# Altium PCB zulu_a7_fab_b.PcbDoc (part 4 of 5)
Units mm, origin at the board's own origin, x right, y up, seen from the top; angles counter-clockwise.
Board outline 69.85 x 25.4 mm, 6 copper layers (Top Layer, L2-GND, L3-SIG, L4-SIG, L5-VCC3V3, Bottom Layer), stack 1.65 mm thick; 178 components, 177 nets, 839 pads, 1782 vias.
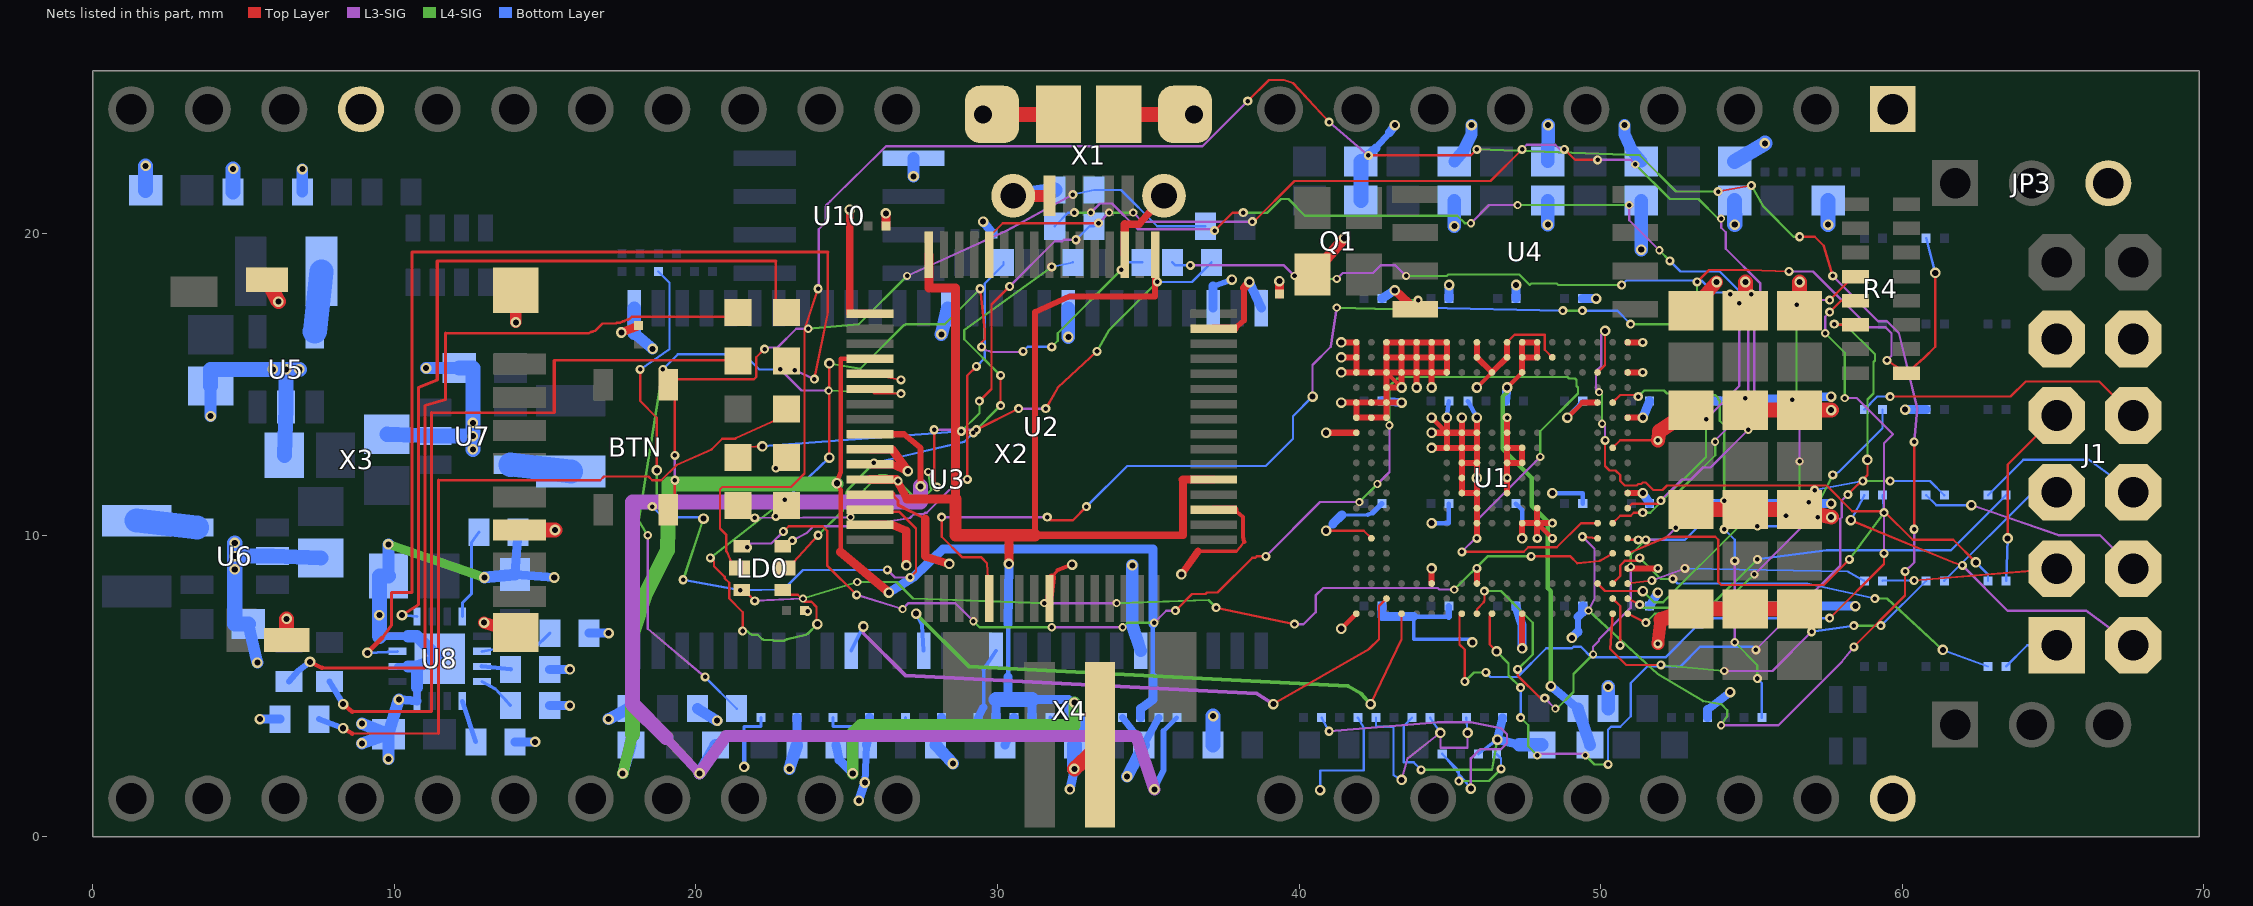
[diagram p7: the nets of this part, all layers, seen from the top]

## Via types
v1: diameter 0.35, hole 0.2, Top Layer to Bottom Layer, tented both sides, 387 vias
v2: diameter 0.27, hole 0.15, L3-SIG to L4-SIG, tented both sides, 368 vias
v3: diameter 0.3, hole 0.15, Top Layer to L2-GND, tented both sides, 299 vias
v4: diameter 0.3, hole 0.15, L2-GND to L3-SIG, tented both sides, 284 vias
v5: diameter 0.3, hole 0.15, L4-SIG to L5-VCC3V3, tented both sides, 223 vias
v6: diameter 0.3, hole 0.15, L5-VCC3V3 to Bottom Layer, tented both sides, 221 vias

## Nets (pads, with @x,y where several pads share a name; then routed paths per layer and width w, separated by ;. In a path a pad name is that pad's centre, name@x,y a point inside that pad or via, vN(x,y) a via of type N, cw(c..) or ccw(c..) an arc to the next point about the centre after c; other vN are vias at no path point) (continued)
FPGA-TDI: R4.14 U1.W10 | length 29.7
  Top Layer w0.076: U1.W10@46.4,7.4 46.325,7.325 46.325,6.375 v1(46.55,6.15) ; v3(57.75,17) 57.772,16.978 R4.14@58.45,16.978 ; v3(58.2,11.35) 58.85,12 v1(58.85,12.5)
  L3-SIG w0.076: v2(47.9,2.7) 47.95,2.75 49.45,2.75 v2(49.5,2.7) ; v2(55.15,6.2) 57.95,9 57.95,10.55 58,10.6 58,11.15 v3(58.2,11.35)
  L4-SIG w0.076: v1(46.55,6.15) 46.95,5.75 46.95,5.35 v5(47.35,4.95) ; v5(47.35,3.95) 47.6,3.7 47.6,3 v2(47.9,2.7) ; v2(49.5,2.7) 49.8,2.4 v5(50.25,2.4) ; v3(57.75,17) 58.1,17 59.1,16 59.1,15.8 59.05,15.75 59.05,14.7 58.85,14.5 v1(58.85,12.5)
  Bottom Layer w0.076: v5(47.35,3.95) v5(47.35,4.95) ; v5(50.25,2.4) 50.25,3.55 50.35,3.65 50.65,3.65 51,4 51,5.1 51.55,5.65 52.65,5.65 53.3,6.3 55.05,6.3 v2(55.15,6.2)
  other v2: 57.75,17
  other v4: 58.2,11.35 57.75,17
  other v5: 55.15,6.2
  other v6: 50.25,2.4 47.35,3.95 47.35,4.95 55.15,6.2
FPGA-TDO: R4.13 U1.W8 | length 29
  Top Layer w0.076: U1.W8@45.4,7.4 45.325,7.325 45.325,6.375 45.5,6.2 v3(45.5,5.15) ; v3(57.6,7.25) 59.4,9.05 v3(59.4,9.4) ; v3(57.6,17.4) 57.978,17.778 R4.13@58.45,17.778
  L3-SIG w0.076: v2(57.45,16.7) 57.45,17.25 v3(57.6,17.4) ; v2(58.1,14.55) 58.5,14.55 59.7,13.35 59.4,13.05 v3(59.4,9.4)
  L4-SIG w0.076: v3(45.5,5.15) 45.8,5.45 v5(46.2,5.45) ; v2(57.45,16.7) 58.1,16.05 v2(58.1,14.55)
  Bottom Layer w0.076: v5(46.2,5.45) 46.35,5.3 47.25,5.3 48.2,6.25 49.05,6.25 49.1,6.3 49.35,6.3 49.7,5.95 52.15,5.95 53.15,6.95 53.4,6.95 53.7,7.25 v3(57.6,7.25)
  other v2: 45.5,5.15 57.6,7.25
  other v4: 45.5,5.15 57.6,7.25 59.4,9.4 57.6,17.4
  other v5: 57.6,7.25
  other v6: 46.2,5.45 57.6,7.25
FPGA-TMS: R4.12 U1.W9 | length 28.1
  Top Layer w0.076: U1.W9@45.9,7.4 45.9,7.55 46.125,7.775 46.125,7.8 46.15,7.825 v3(46.15,8.15) ; v3(47.25,5.55) 47.25,5.35 48,4.6 v3(48.15,4.6) ; v3(57.6,17.8) 58.378,18.578 R4.12@58.45,18.578
  L3-SIG w0.076: v3(48.15,4.6) v2(48.5,4.25) ; v2(49.75,6.05) 49.75,6.3 49.95,6.5 49.95,6.55 51,7.6 v2(51,8.95) ; v2(56.35,14.5) 56.6,14.25 v2(56.6,12.45) ; v2(56.5,17.65) 56.65,17.8 v3(57.6,17.8)
  L4-SIG w0.076: v3(46.15,8.15) 46.7,8.15 47.75,7.1 47.75,6.05 v3(47.25,5.55) ; v2(48.5,4.25) 48.55,4.25 49.1,4.8 49.1,5.4 v2(49.75,6.05) ; v2(51,8.95) 51,9.35 v5(51.5,9.85) ; v5(56.15,10.65) 56.6,11.1 v2(56.6,12.45) ; v2(56.35,14.5) 56.35,14.55 56.5,14.7 v2(56.5,17.65)
  Bottom Layer w0.076: v5(51.5,9.85) 52.8,9.85 53.6,10.65 v5(56.15,10.65)
  other v2: 47.25,5.55 46.15,8.15
  other v4: 48.15,4.6 47.25,5.55 46.15,8.15 57.6,17.8
  other v6: 51.5,9.85 56.15,10.65
FT-PWREN#: U1.P19 U2.60 | length 41.1
  Top Layer w0.076: U2.60@29.725,19.3 29.725,19.9 30.175,20.35 v3(33.35,20.35) ; v3(38.45,20.4) 38.5,20.4 39.85,21.75 46.35,21.75 v3(47.4,22.8) ; v3(48.8,22.8) 49.15,22.45 v3(49.9,22.45) ; U1.P19@50.9,9.9 50.95,9.85 v3(51.25,9.85)
  L3-SIG w0.076: v3(33.35,20.35) v2(33.7,20.7) ; v2(34.5,20.7) 34.8,20.4 v3(38.45,20.4) ; v3(47.4,22.8) 47.55,22.95 48.5,22.95 48.65,22.8 v3(48.8,22.8) ; v3(49.9,22.45) 51,22.45 v2(51.15,22.3) ; v3(51.25,9.85) 52.1,9.85 v2(52.5,10.25) ; v2(53.8,13.1) 53.8,13.15 55.1,14.45 55.1,17.7 55.3,17.9 55.3,18.35 54.15,19.5 54.15,20.05 54,20.2 v2(54,20.5)
  L4-SIG w0.076: v2(33.7,20.7) v2(34.5,20.7) ; v2(51.15,22.3) 52.3,21.15 53.25,21.15 53.9,20.5 v2(54,20.5) ; v2(52.5,10.25) 52.5,11.35 53.8,12.65 v2(53.8,13.1)
  other v4: 51.25,9.85 33.35,20.35 38.45,20.4 49.9,22.45 47.4,22.8 48.8,22.8
FT-REF: R18.2 U2.6 | length 22.4
  Top Layer w0.076: U2.6@25.775,14.85 25.925,14.7 v3(26.8,14.7)
  L3-SIG w0.076: v2(18.4,10) 18.4,6.9 v2(20.3,5.3) ; v2(22.8,15.5) 23.5,14.8 v2(24.4,14.8)
  L4-SIG w0.076: v2(18.4,10) 18.1,10.5 v5(18.9,15.5) ; v2(24.4,14.8) v3(26.8,14.7)
  Bottom Layer w0.076: v5(18.9,15.5) 19.4,16 21.6,16 22.1,15.5 v2(22.8,15.5) ; v2(20.3,5.3) R18.2@21.35,4.25
  other v2: 26.8,14.7
  other v4: 26.8,14.7
  other v5: 20.3,5.3 22.8,15.5
  other v6: 20.3,5.3 18.9,15.5 22.8,15.5
FT-RESETN: R19.1 U2.14 | length 24.3
  Top Layer w0.076: v3(18.15,15.5) 18.15,14.45 18.7,13.9 v1(18.7,12.15) ; v1@20.15,10.6 20.15,10.55 v1(20.25,10.55) ; U2.14@25.775,10.85 25.85,10.775 26.75,10.775 27.3,10.225 27.3,8.8 v3(27.1,8.6)
  L3-SIG w0.076: v2(26.35,8.85) 26.6,8.6 v3(27.1,8.6)
  L4-SIG w0.076: v5(18.55,10.95) 18.7,11.1 v1(18.7,12.15) ; v5(19.575,8.525) v1(20.25,10.55)
  Bottom Layer w0.076: v3(18.15,15.5) 19.125,16.175 19.125,18.375 R19.1@18.75,18.75 ; v5(18.55,10.95) 18.9,10.6 20.15,10.6 v1(20.25,10.55) ; v5(19.575,8.525) v6(21.475,8.175) 22.9,8.2 23.55,8.85 v2(26.35,8.85)
  other v2: 18.15,15.5
  other v4: 27.1,8.6 18.15,15.5
  other v5: 26.35,8.85 18.15,15.5
  other v6: 19.575,8.525 26.35,8.85 18.55,10.95 18.15,15.5
FT-VCORE: C139.2 C152.2 C153.2 C154.2 U2.12 U2.37 U2.49 U2.64 | length 57.3
  Top Layer w0.2: 31.237,10 31.237,17.4 32.4,17.92 35.225,17.92 U2.49@35.225,19.3
  Top Layer w0.26: 31.237,10 36.15,10 36.15,11.85
  Top Layer w0.275: 26.65,11.85 27,11.2
  Top Layer w0.28: 36.15,11.85 U2.37@37.175,11.85
  Top Layer w0.3: U2.12@25.775,11.85 26.65,11.85 ; 27,11.2 28.6,11.2 28.6,18.2 27.725,18.2 U2.64@27.725,19.3 ; v1(30.375,9.05) 30.375,10
  Top Layer w0.4: 28.6,11.2 28.6,10 30.375,10 31.237,10
  L4-SIG w0.39: v1(25.2,2.1) 25.2,3.45
  L4-SIG w0.4: 25.2,3.45 25.45,3.7 32.55,3.7 v1(32.55,4.45)
  Bottom Layer w0.15: 30.35,5.3 30.35,7.05
  Bottom Layer w0.29: 24.75,2.55 v1(25.2,2.1)
  Bottom Layer w0.3: C139.2@24.65,3.05 24.75,2.55 ; C152.2@29.949,3.95 29.949,4.55 ; 30.35,4.55 30.35,5.3 ; 30.35,7.05 v1(30.375,9.05) ; C153.2@31.149,3.95 31.149,4.55 32.349,4.55 ; C154.2@32.349,3.95 32.349,4.55 ; v1(32.55,4.45) 32.349,4.55
  Bottom Layer w0.5: 29.949,4.55 30.35,4.55 31.149,4.55
FT-VPHY: C40.2 L4.1 U2.4 | length 41.1
  Top Layer w0.15: v1@24.65,11.725 v1(24.675,11.725) ; 24.8,9.45 24.8,11.3 24.8,11.5 24.775,11.55 24.65,11.675 24.65,11.7 24.8,12.1 24.8,15.85 U2.4@25.775,15.85
  Top Layer w0.3: 24.8,9.45 v1(26.4,8.1)
  L4-SIG w0.15: v1@24.65,11.7 v1(24.675,11.725)
  L4-SIG w0.37: v1(17.57,2.1) 17.9,3.4
  L4-SIG w0.5: 17.9,3.4 17.9,6.8 18.3,8 19.05,9.5 19.1,11.7 v1@24.65,11.7
  Bottom Layer w0.15: 35.15,5.3 35.15,7.05
  Bottom Layer w0.3: v1(26.4,8.1) 27.2,8.6 28.2,9.55 35.15,9.55 35.15,7.05 ; C40.2@34.749,3.95 34.749,4.25 35.15,4.55 35.15,5.3
  Bottom Layer w0.37: v1(17.57,2.1) L4.1@17.85,3.05
FT-VPLL: C41.2 L5.1 U2.9 | length 43.8
  Top Layer w0.2: U2.9@25.775,13.35 26.9,13.35 27.45,12.9 v1(27.45,11.625)
  L3-SIG w0.3: 19,3.3 v1(20.12,2.1)
  L3-SIG w0.39: v1(20.12,2.1) 21,3.35
  L3-SIG w0.4: 21,3.35 34.6,3.35 v1(35.2,1.575)
  L3-SIG w0.5: 19,3.3 17.9,4.4 17.9,7.4 17.9,11.1 27.45,11.1 v1(27.45,11.625)
  Bottom Layer w0.15: 35.5,3.5 C41.2@35.949,3.95
  Bottom Layer w0.2: v1(35.2,1.575) 35.5,2.2 35.5,3.5
  Bottom Layer w0.39: v1(20.12,2.1) L5.1@20.65,3.05
GND: C3.1 C4.1 C5.1 C6.1 C7.1 C8.1 C9.1 C11.1 C12.1 C13.1 C38.1 C40.1 C41.1 C78.1 C80.1 C82.1 C84.1 C85.2 C86.2 C87.2 C88.2 C89.2 C90.2 C91.2 C92.2 C93.2 C94.2 C95.2 C96.2 C97.2 C98.2 C99.2 C100.2 C101.2 C102.2 C103.2 C104.2 C105.2 C106.2 C107.2 C108.2 C109.2 C110.2 C111.2 C112.2 C113.2 C114.2 C115.2 C116.2 C117.2 C118.2 C119.2 C120.2 C121.2 C122.2 C133.1 C134.1 C135.1 C136.1 C137.1 C138.1 C139.1 C140.2 C141.2 C142.2 C143.2 C144.2 C145.2 C146.2 C147.1 C148.1 C149.1 C150.1 C151.1 C152.1 C153.1 C154.1 C155.1 C156.1 C157.1 C158.1 C159.1 J1.5 J1.11 JP3.3 L6.1 LD1.K LD2.K Q1.2 R5.1 R11.1 R13.2 R15.1 R17.2 R18.1 R21.1 R22.1 R78.1 R86.1 R102.1 R103.1 R104.1 R105.1 R106.1 U1.A1 U1.A3 U1.A4 U1.A5 U1.A6 U1.A7 U1.A9 U1.A11 U1.A19 U1.B1 U1.B3 U1.B4 U1.B5 U1.B6 U1.B7 U1.B9 U1.B11 U1.B14 U1.C1 U1.C2 U1.C3 U1.C4 U1.C5 U1.C6 U1.C7 U1.C10 U1.C19 U1.D3 U1.E1 U1.E2 U1.E3 U1.E17 U1.F1 U1.F2 U1.F3 U1.F19 U1.G1 U1.G7 U1.G8 U1.G9 U1.G11 U1.H7 U1.H8 U1.H9 U1.H11 U1.H12 U1.H18 U1.J8 U1.J9 U1.J11 U1.J12 U1.K8 U1.L8 U1.L9 U1.L11 U1.L19 U1.M9 U1.M13 U1.N9 U1.N12 U1.N13 U1.P2 U1.T19 U1.U6 U1.U9 U1.V18 U1.W1 U1.W12 U2.1 U2.5 U2.10 U2.11 U2.13 U2.15 U2.25 U2.35 U2.47 U2.51 U3.6 U3.12 U3.28 U3.41 U3.46 U3.52 U3.54 U4.4 U5.2 U6.2 U7.2 U8.4 U8.6 U8.8 U8.17 U10.5 X1.5 X1.MH1 X1.MH2 X1.MP1 X1.MP2 X1.MP3 X1.MP4 X1.MS1 X1.MS2 X2.1 X2.17 X2.21 X3.6 X3.G1 X3.G2 X3.G3 X3.G4 X4.2 | length 267.2
  Top Layer w0.076: U2.5@25.775,15.35 v3(26.8,15.15) ; 37.93,9.47 38.056,9.622 38.18,9.78 ; v1(40.9,10.15) 42.15,10.15 U1.P2@42.4,9.9 ; U1.A11@46.9,16.4 47.15,16.65 48.15,16.65 48.15,16.15 U1.B14@48.4,15.9 ; U1.V18@50.4,7.9 50.65,7.65 v3(50.65,6.35) ; U1.H18@50.4,12.9 50.65,13.15 v3(51.9,13.15)
  Top Layer w0.1: U2.13@26.5,11.35 26.7,11.15 26.7,11 27.6,10.55
  Top Layer w0.105: 36.65,9.47 37.93,9.47
  Top Layer w0.11: U2.25@31.8,8.6 32,8.85
  Top Layer w0.13: U2.35@37.85,10.85 38.14,10.6 38.14,9.95
  Top Layer w0.14: 38.14,9.95 38.18,9.78
  Top Layer w0.145: 32,8.85 v1(32.475,9.025)
  Top Layer w0.15: v1(41.4,6.9) U1.W1@41.9,7.4 ; U1.C3@42.9,15.4 v1(43.4,14.9) ; v1(44.4,13.9) U1.G7@44.9,13.4 ; v1(45.9,14.9) U1.C10@46.4,15.4 ; U1.N13@47.9,10.4 v3(48.4,9.9) ; v1(48.9,13.9) 49.4,14.4
  Top Layer w0.18: U2.47@37.85,16.85 38.175,17.125
  Top Layer w0.2: v1(40.9,13.4) U1.G1@41.9,13.4 ; v1(41.4,14.4) U1.E1@41.9,14.4 ; v1(41.4,15.4) U1.C1@41.9,15.4 ; v1(41.4,15.9) U1.B1@41.9,15.9 ; v1(41.4,16.4) U1.A1@41.9,16.4 U1.B1@41.9,15.9 ; v1(43.4,14.4) U1.E3@42.9,14.4 ; v1(43.9,14.9) U1.C5@43.9,15.4 ; U1.U6@44.4,8.4 v1(44.4,8.9) ; v1(44.4,12.9) U1.H7@44.9,12.9 ; v1(44.4,13.4) U1.G7@44.9,13.4 ; v1(44.4,14.9) U1.C6@44.4,15.4 ; v1(44.9,13.9) U1.G7@44.9,13.4 ; v1(45.4,13.9) U1.G8@45.4,13.4 ; U1.U9@45.9,8.4 v3(45.9,8.9) ; v3(45.9,9.9) U1.N9@45.9,10.4 U1.M9@45.9,10.9 U1.L9@45.9,11.4 ; v1(45.9,13.9) U1.G9@45.9,13.4 ; U1.A9@45.9,16.4 U1.B9@45.9,15.9 U1.C10@46.4,15.4 U1.B11@46.9,15.9 U1.A11@46.9,16.4 ; U1.L11@46.9,11.4 v3(46.9,11.9) U1.J11@46.9,12.4 ; v3(46.9,13.9) U1.G11@46.9,13.4 U1.H11@46.9,12.9 ; v1(47.4,6.25) U1.W12@47.4,7.4 ; v1(47.4,9.9) U1.N12@47.4,10.4 U1.N13@47.9,10.4 ; v3(47.9,9.9) U1.N13@47.9,10.4 ; U1.M13@47.9,10.9 U1.N13@47.9,10.4 ; v3(48.4,10.4) U1.N13@47.9,10.4 ; 49.4,14.4 U1.E17@49.9,14.4 ; U1.T19@50.9,8.9 v3(51.9,8.9) ; U1.L19@50.9,11.4 v1(51.4,11.4) ; U1.F19@50.9,13.9 v1(51.4,13.9) ; U1.C19@50.9,15.4 v3(51.4,15.4) ; U1.A19@50.9,16.4 v3(51.4,16.4) ; U1.E1@41.9,14.4 U1.F1@41.9,13.9 U1.F2@42.4,13.9 U1.F3@42.9,13.9 ; U1.E1@41.9,14.4 U1.E2@42.4,14.4 U1.E3@42.9,14.4 ; U1.C1@41.9,15.4 U1.C2@42.4,15.4 U1.C3@42.9,15.4 ; U1.C1@41.9,15.4 U1.B1@41.9,15.9 ; U1.F3@42.9,13.9 U1.E3@42.9,14.4 ; U1.F3@42.9,13.9 U1.E3@42.9,14.4 ; U1.E3@42.9,14.4 U1.D3@42.9,14.9 ; U1.D3@42.9,14.9 U1.C3@42.9,15.4 ; U1.D3@42.9,14.9 v1(43.4,14.9) U1.C4@43.4,15.4 ; U1.C3@42.9,15.4 U1.B3@42.9,15.9 ; U1.C3@42.9,15.4 U1.C4@43.4,15.4 ; U1.B3@42.9,15.9 U1.B4@43.4,15.9 ; U1.B3@42.9,15.9 U1.A3@42.9,16.4 U1.A4@43.4,16.4 ; U1.C4@43.4,15.4 U1.B4@43.4,15.9 ; U1.C4@43.4,15.4 U1.C5@43.9,15.4 ; U1.B4@43.4,15.9 U1.B5@43.9,15.9 ; U1.B4@43.4,15.9 U1.A4@43.4,16.4 ; U1.A4@43.4,16.4 U1.A5@43.9,16.4 ; U1.C5@43.9,15.4 U1.B5@43.9,15.9 ; U1.C5@43.9,15.4 U1.C6@44.4,15.4 ; U1.B5@43.9,15.9 U1.B6@44.4,15.9 ; U1.B5@43.9,15.9 U1.A5@43.9,16.4 ; U1.A5@43.9,16.4 U1.A6@44.4,16.4 ; U1.C6@44.4,15.4 U1.B6@44.4,15.9 ; U1.C6@44.4,15.4 U1.C7@44.9,15.4 ; U1.C6@44.4,15.4 U1.C7@44.9,15.4 ; U1.B6@44.4,15.9 U1.B7@44.9,15.9 ; U1.B6@44.4,15.9 U1.A6@44.4,16.4 ; U1.A6@44.4,16.4 U1.A7@44.9,16.4 U1.B7@44.9,15.9 ; U1.H7@44.9,12.9 U1.H8@45.4,12.9 ; U1.H7@44.9,12.9 U1.G7@44.9,13.4 ; U1.G7@44.9,13.4 U1.G8@45.4,13.4 ; U1.C7@44.9,15.4 U1.B7@44.9,15.9 ; U1.J8@45.4,12.4 U1.K8@45.4,11.9 U1.L8@45.4,11.4 U1.L9@45.9,11.4 ; U1.J8@45.4,12.4 U1.J9@45.9,12.4 ; U1.J8@45.4,12.4 U1.H8@45.4,12.9 ; U1.H8@45.4,12.9 U1.H9@45.9,12.9 ; U1.H8@45.4,12.9 U1.G8@45.4,13.4 ; U1.G8@45.4,13.4 U1.G9@45.9,13.4 ; U1.L9@45.9,11.4 v1(45.9,11.9) U1.J9@45.9,12.4 ; U1.J9@45.9,12.4 U1.H9@45.9,12.9 ; U1.H9@45.9,12.9 U1.G9@45.9,13.4 ; U1.J11@46.9,12.4 U1.J12@47.4,12.4 U1.H12@47.4,12.9 U1.H11@46.9,12.9 ; U1.J11@46.9,12.4 U1.H11@46.9,12.9
  Top Layer w0.21: 38.175,17.125 38.175,18.2
  Top Layer w0.22: U2.13@25.775,11.35 U2.13@26.5,11.35
  Top Layer w0.24: v1(36.1,8.7) 36.65,9.47
  Top Layer w0.245: 34.225,20.32 34.7,20.32 X1.MH2@35.52,21.258
  Top Layer w0.26: v1(25.1,20.8) 25.1,17.35 U2.1@25.775,17.35 ; U2.11@26.5,12.35 v1(27.025,12.125)
  Top Layer w0.27: U2.25@31.725,7.9 U2.25@31.8,8.6
  Top Layer w0.28: U2.15@25.775,10.35 26.5,10.35 26.975,10.15 v1(26.975,9) ; U2.11@25.775,12.35 U2.11@26.5,12.35 ; U2.10@25.775,12.85 26.5,12.85 v1(27.025,12.125) ; 27.6,10.55 27.6,9.3 v1(28.4,9.05) ; U2.51@34.225,19.3 34.225,20.32 ; U2.35@37.175,10.85 U2.35@37.85,10.85 ; U2.47@37.175,16.85 U2.47@37.85,16.85 ; 38.175,18.2 v1(38.35,18.4)
  Top Layer w0.3: v1(17.525,16.725) C158.1@18.1,16.95 ; C155.1@26.3,20.25 v1(26.3,20.675) ; C157.1@39.35,18 v1(39.35,18.425) ; v1(43.175,18.125) U4.4@43.85,17.495
  Top Layer w0.365: Q1.2@40.45,18.65 v1(41.5,19.85)
  Top Layer w0.38: v1(14.025,17.06) X3.G4@14.025,18.125
  Top Layer w0.4: v1(12.975,7.1) X3.G1@14.025,6.775 ; X1.MH1@30.52,21.258 X1.5@31.72,21.258
  Top Layer w0.425: v3(51.9,6.4) 52,7.2
  Top Layer w0.43: C93.2@53,17.449 v1(53.85,18.4)
  Top Layer w0.465: v3(51.9,13.15) 51.95,13.45
  Top Layer w0.5: X3.G3@5.775,18.475 v1(6.15,17.75) ; X3.G2@6.425,6.525 v1(6.425,7.225) ; X3.6@14.15,10.175 v1(15.325,10.175) ; X1.MS1@29.52,23.959 X1.MP2@32.02,23.959 ; v1(32.55,2.25) X4.2@33.4,3.05 ; X1.MP3@34.02,23.959 X1.MS2@36.52,23.959 ; 51.95,13.45 C146.2@53,14.149 ; 52,7.2 C140.2@53,7.55 C141.2@54.8,7.55 C142.2@56.6,7.55 ; C143.2@53,10.849 C144.2@54.8,10.849 C145.2@56.6,10.849 v1(57.65,10.6) ; C85.2@54.8,14.149 C86.2@56.6,14.149 v1(57.65,14.149) ; C97.2@54.8,17.449 v1(54.8,18.4) ; C98.2@56.6,17.449 v1(56.6,18.4)
  L4-SIG w0.076: v5(44.05,2.22) 46.4,2.22 v1(46.575,3.225)
  L4-SIG w0.3: v1(9.8,9.7) v1(12.98,8.6)
  Bottom Layer w0.076: v1(40.7,1.55) 40.7,2.2 42.15,2.2 42.15,3.6 R13.2@41.95,3.95 ; R15.1@43.75,3.95 43.47,3.671 43.47,2.47 43.8,2.47 v5(44.05,2.22)
  Bottom Layer w0.1: 21.6,3.45 21.6,3.65 22.15,3.65 C133.1@22.15,3.95 ; C135.1@24.55,3.95 24.55,3.65 25.75,3.65 26.95,3.65 C137.1@26.95,3.95 ; C152.1@29.349,3.95 29.35,3.65 30.5,3.65 31.75,3.65 C154.1@31.749,3.95
  Bottom Layer w0.105: R11.1@45.95,2.75 v1(46.575,3.225)
  Bottom Layer w0.11: 41.425,10.675 42.275,10.675 ; 43.8,7.3 43.8,6.55 45.65,6.55 v1(45.75,6.45)
  Bottom Layer w0.115: 29.54,4.3 29.54,5.55
  Bottom Layer w0.13: 29.54,5.55 U3.12@29.95,6.17 ; C154.1@31.749,3.95 C6.1@32.55,3.05 ; v1(40.9,10.15) 41.125,10.375
  Bottom Layer w0.145: 42.275,10.675 42.45,10.75
  Bottom Layer w0.15: v1(21.6,2.316) 21.6,3.45 ; v1(44.4,10.4) 44.97,10.4 C90.2@44.97,11.05 ; v1(44.9,13.9) C96.2@44.97,14.45 ; C92.2@45.6,14.45 v1(45.9,13.9) ; C89.2@47.19,11.05 47.4,10.84 v1(47.4,9.9) ; v1(48.4,11.4) 49.41,11.4 C91.2@49.41,11.05 ; v1(48.9,13.9) C95.2@49.41,14.45
  Bottom Layer w0.16: 43.8,7.3 44.97,7.3
  Bottom Layer w0.18: 42.45,10.75 C108.2@42.75,11.05
  Bottom Layer w0.205: 37.15,18.26 v1(37.775,18.475)
  Bottom Layer w0.21: C106.2@42.55,22.85 43,23.35 ; 44.97,7.3 C109.2@44.97,7.65 ; 49.25,6.8 49.25,7.3
  Bottom Layer w0.23: v1(25.6,1.8) C3.1@25.65,3.05 ; C40.1@34.149,3.95 C7.1@34.85,3.05
  Bottom Layer w0.24: 9.5,6.65 U8.8@10.1,6.65 10.45,6.65 ; U8.6@10.1,5.65 10.45,5.65 ; U8.4@10.75,4.5 10.75,4.95
  Bottom Layer w0.255: C152.1@29.349,3.95 29.54,4.3
  Bottom Layer w0.26: C7.1@34.85,3.05 C41.1@35.349,3.95
  Bottom Layer w0.265: 53.55,4.22 v1(54.3,4.8)
  Bottom Layer w0.28: 49.25,7.3 49.41,7.45
  Bottom Layer w0.29: v1(46.575,3.225) R17.2@46.75,3.95
  Bottom Layer w0.295: v1(46.575,3.225) 47.3,3.05
  Bottom Layer w0.3: v1(5.535,3.9) R78.1@6.2,3.9 ; v1(10.15,4.55) U8.4@10.75,4.5 ; R106.1@14.001,3.147 v1(14.667,3.147) ; R103.1@14.1,10.1 C150.1@14.002,8.7 v1(15.3,8.6) ; R102.1@15.151,4.349 v1(15.817,4.349) ; R105.1@15.151,5.55 v1(15.817,5.55) ; R104.1@16.453,6.752 v1(17.103,6.752) ; C139.1@23.35,3.05 C134.1@23.35,3.95 ; v1(25.4,1.2) v1(25.6,1.8) ; C3.1@25.65,3.05 25.75,3.65 C136.1@25.75,3.95 ; C4.1@27.95,3.05 C138.1@28.15,3.95 ; v1(29.525,20.4) C156.1@29.85,20 ; C5.1@30.25,3.05 30.5,3.65 C153.1@30.549,3.95 ; v1(32.4,1.575) v1(32.55,2.25) ; C6.1@32.55,3.05 C38.1@32.949,3.95 ; U3.52@37.15,17.53 37.15,18.26 ; v1(38.35,18.4) U3.54@38.75,17.53 ; 41.125,10.375 41.425,10.675 ; C106.2@42.05,22.4 C106.2@42.55,22.85 ; C113.2@42.75,7.65 42.75,7.3 43.8,7.3 ; C112.2@42.75,14.45 v1(43.4,14.4) ; C120.2@42.75,17.85 v1(43.175,18.125) ; 43,23.35 v1(43.18,23.6) ; C117.2@44.97,17.85 v1(44.975,18.3) ; C107.2@47.19,7.65 47.4,7 v1(47.4,6.25) ; C116.2@47.19,17.85 v1(47.2,18.3) ; v1(49.05,6.6) 49.25,6.8 ; 49.41,7.45 C110.2@49.41,7.65 ; C118.2@49.41,17.85 v1(49.85,17.85) ; v1(51.4,11.4) C111.2@51.63,11.05 ; v1(51.4,13.9) C114.2@51.63,14.45 ; C115.2@51.63,7.65 v1(51.9,8.1) ; R22.1@53.55,3.95 53.55,4.22 ; C122.2@53.85,7.65 v1(58.45,7.65) ; C119.2@53.85,11.05 v1(57.65,11.05) ; C121.2@53.85,14.45 v1(57.65,14.6) ; v1(60.1,14.17) R5.1@60.8,14.17
  Bottom Layer w0.36: R18.1@20.05,4.25 v1(20.7,3.85)
  Bottom Layer w0.37: 17.95,16.7 v1(18.56,16.18)
  Bottom Layer w0.38: C12.1@6.95,21.39 v1(6.95,22.14)
  Bottom Layer w0.4: v1(3.906,13.952) C80.1@3.906,14.952 ; C82.1@5.154,7.058 v1(5.454,5.779) ; v1(8.92,3.1) C151.1@9.8,3.398 ; v1(8.92,3.75) C151.1@9.8,3.398 ; v1(9.8,2.58) C151.1@9.8,3.398 ; C78.1@9.8,8.651 v1(9.8,9.7) ; v1(10.15,4.55) C151.1@9.8,3.398 ; 10.45,5.65 U8.17@10.75,5.65 ; 10.45,6.65 10.75,6.65 U8.17@11.5,5.9 U8.17@10.75,5.65 ; 10.75,4.95 U8.17@10.75,5.65 ; v1(11.05,15.542) C84.1@12.15,15.542 ; v1(12.98,8.6) C150.1@14.002,8.7 ; v1(17.1,3.9) C9.1@17.75,4.25 ; v1(23.1,2.25) C139.1@23.35,3.05 ; v1(27.215,21.9) U10.5@27.215,22.505 ; C4.1@27.95,3.05 v1(28.52,2.43) ; v1(34.3,2) C7.1@34.85,3.05 ; C87.2@45.15,22.4 45.45,22.75 45.72,23.3 v1(45.72,23.6) ; v1(50.8,23.6) 50.8,23.3 51.05,22.75 C94.2@51.349,22.4
  Bottom Layer w0.41: v1(34.475,9) 34.475,7 U3.6@34.75,6.17
  Bottom Layer w0.45: 17.95,16.7 U3.28@17.95,17.53 ; v1(28.14,16.66) U3.41@28.35,17.53 ; v1(32.35,16.575) U3.46@32.35,17.53 ; v1(45.15,20.25) C101.2@45.15,21.1 ; 47.3,3.05 L6.1@48.05,3.05 ; v1(48.25,20.3) C102.2@48.249,21.1 ; C88.2@48.249,22.4 v1(48.26,23.6) ; R21.1@50.25,4.25 v1(50.25,4.975) ; v1(51.35,19.475) C103.2@51.349,21.1
  Bottom Layer w0.5: C13.1@1.75,21.44 v1(1.75,22.25) ; C80.1@3.906,14.952 3.906,15.502 v1(5.968,15.502) v1(6.408,15.502) ; C11.1@4.65,21.39 v1(4.65,22.15) ; v1(4.704,9.75) v1(4.704,9.31) ; C82.1@5.154,7.058 4.704,7.058 v1(4.704,8.87) v1(4.704,9.31) ; C147.1@6.348,12.651 U5.2@6.408,14.252 v1(6.408,15.502) ; v1(6.848,15.502) v1(6.408,15.502) ; C148.1@7.555,9.25 U6.2@5.954,9.31 v1(4.704,9.31) ; 9.5,6.65 v1(9.5,7.35) 9.5,8.651 C78.1@9.8,8.651 ; C149.1@9.748,13.35 U7.2@11.35,13.29 v1(12.6,13.29) ; C84.1@12.15,15.542 12.6,15.542 v1(12.6,13.73) v1(12.6,13.29) ; v1(12.6,12.85) v1(12.6,13.29) ; X1.MH1@30.52,21.258 R86.1@31.9,21.45 ; v1(32.55,2.25) C6.1@32.55,3.05 ; C8.1@37.15,3.05 v1(37.15,4) ; C100.2@42.05,21.1 C106.2@42.05,22.4 ; C104.2@54.449,21.1 v1(54.45,20.3) ; C99.2@54.449,22.4 v1(55.45,23) ; C105.2@57.549,21.1 v1(57.55,20.3)
  other v3: 23.7,7.475 22.65,10.625 22.65,12.225
  other v4: 26.8,15.15
  other v6: 44.05,2.22
GNDADC: C123.2 C124.2 L6.2 U1.A12 U1.A13 U1.B12 U1.B13 U1.C12 | length 16.7
  Top Layer w0.15: v1(46.9,14.9) U1.C12@47.4,15.4
  Top Layer w0.2: U1.C12@47.4,15.4 U1.B12@47.4,15.9 ; U1.B12@47.4,15.9 U1.B13@47.9,15.9 U1.A13@47.9,16.4 U1.A12@47.4,16.4 U1.B12@47.4,15.9
  L4-SIG w0.15: v1(46.9,14.9) 46.9,14.75 46.75,14.6 46.75,12.87 47.72,11.9 47.72,10.98 48.25,10.45 48.25,8.25 48.35,8.15 v1(48.35,5)
  Bottom Layer w0.285: v1(48.35,5) C124.2@49.25,4.25
  Bottom Layer w0.3: C123.2@46.85,14.45 v1(46.9,14.9)
  Bottom Layer w0.4: C124.2@49.25,4.25 L6.2@49.65,3.05
JA1: R26.1 U1.U18 | length 14.2
  Top Layer w0.076: U1.U18@50.4,8.4 50.65,8.65 50.65,9 50.8,9.15 51.2,9.15 v3(51.3,9.25)
  L4-SIG w0.076: v3(51.3,9.25) 52,8.55 v5(52.4,8.55) ; v5(59.1,7.9) 59.5,7.9 v1(61.35,6.2)
  Bottom Layer w0.076: v5(52.4,8.55) 52.55,8.4 56.85,8.4 v5(59.1,7.9) ; v1(61.35,6.2) R26.1@62.85,5.65
  other v2: 51.3,9.25
  other v4: 51.3,9.25
  other v6: 59.1,7.9 52.4,8.55
JA2: R27.1 U1.U19 | length 8
  Top Layer w0.076: U1.U19@50.9,8.4 v3(51.7,8.5)
  L3-SIG w0.076: v3(51.7,8.5) v2(52.8,8.9)
  Bottom Layer w0.076: v2(52.8,8.9) 58.2,8.8 R27.1@58.75,8.49
  other v4: 51.7,8.5
  other v5: 52.8,8.9
  other v6: 52.8,8.9
JA3: R28.1 U1.W18 | length 13
  Top Layer w0.076: U1.W18@50.4,7.4 50.325,6.225 50.85,5.7 v3(52,5.7)
  L3-SIG w0.076: v2(54.1,5.5) 55.7,5.5 v2(57,6.8)
  L4-SIG w0.076: v3(52,5.7) v2(54.1,5.5) ; v5(58.4,7) v5(59.3,7)
  Bottom Layer w0.076: v2(57,6.8) v5(58.4,7) ; v5(59.3,7) R28.1@60.8,8.49
  other v2: 52,5.7
  other v4: 52,5.7
  other v5: 57,6.8
  other v6: 57,6.8 58.4,7 59.3,7
JA4: R29.1 U1.C17 | length 20.9
  Top Layer w0.076: U1.C17@49.9,15.4 50.15,15.65 v1(50.15,16.78) ; v3(50.15,13.15) 50.15,12.3 50.3,12.15 50.5,12.15 50.65,12 50.65,11.8 50.8,11.65 51.2,11.65 51.25,11.7 51.35,11.7 51.4,11.75 51.5,11.75 51.75,11.5 52.05,11.5 52.2,11.65 57.5,11.65 58.35,10.8 59.4,10.8 60.35,9.85 61.7,9.85 v1(62.45,9.1)
  L3-SIG w0.076: v2(49.95,14.75) 49.85,14.85 49.85,15.45 50.025,15.625 50.025,16.655 v1(50.15,16.78) ; v2(50.05,13.7) 50.15,13.6 v3(50.15,13.15)
  L4-SIG w0.076: v2(49.95,14.75) 50.05,14.65 v2(50.05,13.7)
  Bottom Layer w0.076: v1(62.45,9.1) 62.85,8.7 R29.1@62.85,8.49
  other v4: 50.15,13.15
JA7: R30.2 U1.R19 | length 11.8
  Top Layer w0.076: U1.R19@50.9,9.4 52.225,9.95 53.8,9.95 53.9,9.85 53.9,8.45 54,8.35 57.4,8.35 v3(58.25,9.2)
  L4-SIG w0.076: v3(58.25,9.2) v5(59.4,10.75)
  Bottom Layer w0.076: R30.2@59.35,11.33 v5(59.4,10.75)
  other v2: 58.25,9.2
  other v4: 58.25,9.2
  other v6: 59.4,10.75
JA8: R31.2 U1.W19 | length 13
  Top Layer w0.076: U1.W19@50.9,7.4 v3(51.5,7.1)
  L3-SIG w0.076: v2(55.1,8.7) 56.9,10.5 v2(56.9,11.1)
  L4-SIG w0.076: v3(51.5,7.1) 51.8,7.4 53.7,7.4 v2(55.1,8.7) ; v2(56.9,11.1) v5(57.1,11.5) ; v5(58.7,11.8) v5(59.6,11.8)
  Bottom Layer w0.076: v5(57.1,11.5) v5(58.7,11.8) ; v5(59.6,11.8) 60.93,11.8 R31.2@61.4,11.33
  other v2: 51.5,7.1
  other v4: 51.5,7.1
  other v6: 57.1,11.5 58.7,11.8 59.6,11.8
JA9: R32.2 U1.V19 | length 14.1
  Top Layer w0.076: U1.V19@50.9,7.9 v3(51.3,7.7)
  L4-SIG w0.076: v3(51.3,7.7) 51.4,7.6 53.6,7.6 v5(55.2,9.2)
  Bottom Layer w0.076: v5(55.2,9.2) 57.5,9.5 61.62,9.5 R32.2@63.45,11.33
  other v2: 51.3,7.7
  other v4: 51.3,7.7
  other v6: 55.2,9.2
JA10: R33.2 U1.U17 | length 13.1
  Top Layer w0.076: U1.U17@49.9,8.4 50.15,8.15 v1(51.4,8.15)
  L4-SIG w0.076: v1(51.4,8.15) 51.775,7.775 52.075,7.775 54.6,10.3 v5(55.2,10.3) ; v5(57.2,10.6) 57.3,11.2 v5(57.7,12)
  Bottom Layer w0.076: v5(55.2,10.3) 56.9,10.3 v5(57.2,10.6) ; v5(57.7,12) 57.9,12.1 59.35,13.55 R33.2@59.35,14.17
  other v6: 55.2,10.3 57.2,10.6 57.7,12
LD5_K: LD5.K R78.2 | length 24.4
  Top Layer w0.076: 8.6,3.425 11.455,3.425 ; 11.45,11.825 16.825,11.825 16.95,11.95 18.425,11.95 18.55,11.825 18.85,11.825 19.35,12.325 20.525,12.85 20.875,13.2 21.3,13.2 21.325,13.225 LD5.K@22.65,13.825
  Top Layer w0.1: 11.455,3.425 11.455,11.825
  Top Layer w0.15: v1(8.3,3.6) 8.6,3.425
  Bottom Layer w0.2: R78.2@7.5,3.9 v1(8.3,3.6)
LDQM: U1.W4 U3.15 | length 20.6
  Top Layer w0.076: v1(42.375,4.4) 43.4,6.55 U1.W4@43.4,7.4
  L4-SIG w0.125: v1(27.3,7.4) 29.05,5.65 41.625,5 42.05,4.75 v1(42.375,4.4)
  Bottom Layer w0.125: v1(27.3,7.4) 27.5,7.025 U3.15@27.55,6.17
LED0_B: LD0.2 U1.N17 | length 47.3
  Top Layer w0.076: v3(22.9,10.125) 23.075,10.3 24.2,10.3 24.35,10.15 24.35,9 v3(25.325,8.025) ; v3(35.9,7.5) 36.45,8.05 36.9,8.05 36.95,8.1 37.3,8.1 38.45,9.25 38.55,9.25 38.6,9.3 v3(38.9,9.3) ; v3(45.4,9.45) 47.45,9.45 47.6,9.6 48.55,9.6 49.35,10.4 U1.N17@49.9,10.4
  L3-SIG w0.076: v3(21.7,9.6) 21.825,9.725 22.5,9.725 v3(22.9,10.125) ; v3(25.325,8.025) v2(26.85,7.55) 27.05,7.75 28.6,7.75 v2(29.2,7.15) ; v2(31.8,6.95) v2(34.15,6.95) ; v2(35.2,7.1) 35.6,7.5 v3(35.9,7.5) ; v3(38.9,9.3) 40.7,11.1 v2(42,11.1) ; v2(42.6,11.7) 43,12.1 v2(43,13.65) ; v3(45.4,9.45) 45.85,9.9 45.85,10.45 v2(48,12.6)
  L4-SIG w0.076: v2(29.2,7.15) 29.4,6.95 v2(31.8,6.95) ; v2(34.15,6.95) 34.3,7.1 v2(35.2,7.1) ; v2(42,11.1) v2(42.6,11.7) ; v2(43,13.65) 43,14.95 43.25,15.2 43.35,15.2 43.4,15.25 48.9,15.25 48.95,15.2 49.15,15.2 49.2,15.15 49.2,14.95 49.25,14.9 49.25,14.7 48,13.45 v2(48,12.6)
  other v4: 35.9,7.5 25.325,8.025 38.9,9.3 45.4,9.45 21.7,9.6 22.9,10.125
LED0_G: LD0.6 U1.R18 | length 30.7
  Top Layer w0.076: LD0.6@21.725,8.05 v3(21.95,7.825) ; v3(37.25,7.6) v3(39.85,7.05) ; v3(47.7,9.3) 49,9.3 49.225,9.075 49.975,9.15 U1.R18@50.4,9.4
  L3-SIG w0.076: v3(21.95,7.825) v2(23.55,7.9) ; v2(31.55,7.75) v2(33.95,7.75) ; v3(39.85,7.05) 40.15,7.05 40.55,7.45 40.55,8 40.8,8.25 44.6,8.25 44.65,8.2 v2(45.15,8.2)
  L4-SIG w0.076: v2(23.55,7.9) v2(25.35,8.45) 26.65,8.45 27.2,7.9 v2(31.55,7.75) ; v2(33.95,7.75) 37,7.85 v3(37.25,7.6) ; v2(45.15,8.2) 46.25,9.3 v3(47.7,9.3)
  other v2: 37.25,7.6 47.7,9.3
  other v4: 39.85,7.05 37.25,7.6 21.95,7.825 47.7,9.3
LED0_R: LD0.4 U1.P17 | length 82.3
  Top Layer w0.076: LD0.4@21.175,9.1 21.025,9.45 21,9.475 21,10.025 20.8,10.225 20.8,11.525 20.875,11.6 23.15,11.6 23.6,12.05 23.6,16.825 v3(24.05,18.175) ; v3(38.3,24.4) 39,25.1 39.5,25.1 39.8,25 v3(41,23.7) ; v3(42.3,22.6) 45.7,22.6 v3(45.9,22.8) ; v3(49.4,9.95) U1.P17@49.9,9.9 ; v3(53.9,21.4) v3(55,21.6) ; v3(56.6,19.9) 57.1,19.9 57.4,19.6 v3(57.7,18.6) ; v3(58.4,6.3) 60.1,8 v3(60.1,8.8) ; v3(60.4,10.2) v3(60.4,13.1)
  L3-SIG w0.076: v3(24.05,18.175) 24.075,18.2 24.075,20.15 24.3,20.375 24.3,20.9 24.325,20.95 24.45,21.075 26.3,22.9 36.8,22.9 v3(38.3,24.4) ; v3(41,23.7) v3(42.3,22.6) ; v3(49.4,9.95) 49.8,9.55 49.8,7.9 v2(49.6,7.5) ; v2(54,3.7) 55.9,3.7 58,5.8 v3(58.4,6.3) ; v3(57.7,18.6) 59.2,17.1 59.5,17.1 59.9,16.7 60.5,14.2 v3(60.4,13.1) ; v3(60.1,8.8) 60.4,9.1 v3(60.4,10.2)
  L4-SIG w0.076: v3(45.9,22.8) 51.3,22.6 52.5,21.4 v3(53.9,21.4) ; v2(49.6,7.5) 51.9,5.4 53.4,4.5 54,4.4 54.2,4.2 54.2,4 v2(54,3.7) ; v3(55,21.6) 55.4,20.9 56.4,19.9 v3(56.6,19.9)
  other v2: 49.4,9.95 56.6,19.9 53.9,21.4 55,21.6 45.9,22.8
  other v4: 58.4,6.3 60.1,8.8 49.4,9.95 60.4,10.2 60.4,13.1 24.05,18.175 57.7,18.6 56.6,19.9 53.9,21.4 55,21.6 42.3,22.6 45.9,22.8 41,23.7 38.3,24.4
LED1: R83.1 U1.N18 | length 29.5
  Top Layer w0.076: U1.N18@50.4,10.4 50.65,10.65 51,10.65 51.1,10.75 v3(51.4,10.75)
  L3-SIG w0.076: v2(36.4,18.95) 39.5,18.95 v2(39.85,18.6) ; v2(41.25,18.5) 41.45,18.7 42.45,18.7 42.7,18.95 43.2,18.95 v2(43.55,18.6) ; v2(53.5,13.85) 54.6,14.95 v2(54.6,17.7)
  L4-SIG w0.076: v2(39.85,18.6) 39.95,18.5 v2(41.25,18.5) ; v2(43.55,18.6) 44.9,18.6 44.95,18.65 47.3,18.65 47.65,18.3 47.7,18.35 48.55,18.35 48.6,18.3 v5(50.7,18.3) ; v3(51.4,10.75) 51.65,10.75 53.5,12.6 v2(53.5,13.85) ; v5(54.3,18) v2(54.6,17.7)
  Bottom Layer w0.076: R83.1@35.8,19.05 35.9,18.95 v2(36.4,18.95) ; v5(50.7,18.3) 50.85,18.45 53.35,18.45 53.7,18.1 53.75,18.1 53.8,18.05 54.25,18.05 v5(54.3,18)
  other v2: 51.4,10.75
  other v4: 51.4,10.75
  other v5: 36.4,18.95
  other v6: 54.3,18 50.7,18.3 36.4,18.95
LED2: R84.1 U1.M19 | length 36.1
  Top Layer w0.076: v3(37.2,20.1) 37.8,20.7 v3(38.15,20.7) ; U1.M19@50.9,10.9 51.05,11.05 52,11.05 v3(52,11.15)
  L3-SIG w0.076: v2(33.1,20.7) 33.4,21 33.8,21 34.65,20.15 37.15,20.15 v3(37.2,20.1) ; v2(45.7,20.35) 46.3,20.95 v2(47.25,20.95) ; v2(50.95,20.95) 50.95,20.45 v2(51.95,19.45) ; v3(52,11.15) 52.7,11.85 53,11.85 53.4,12.25 53.65,12.25 v2(54.9,13.5) ; v2(54.8,14.55) 54.9,14.65 54.9,17.75 55,17.85 v2(55,18)
  L4-SIG w0.076: v5(32.55,20.7) v2(33.1,20.7) ; v3(38.15,20.7) 38.95,20.7 39.4,21.15 39.65,21.15 40.2,20.6 45.25,20.6 45.5,20.35 v2(45.7,20.35) ; v2(47.25,20.95) v2(50.95,20.95) ; v2(51.95,19.45) v5(52.3,19.1) ; v2(54.8,14.55) 54.8,13.6 v2(54.9,13.5)
  Bottom Layer w0.076: R84.1@31.9,20.25 32.35,20.7 v5(32.55,20.7) ; v5(52.3,19.1) 52.65,18.75 53.95,18.75 54.7,18 v2(55,18)
  other v2: 38.15,20.7
  other v4: 52,11.15 37.2,20.1 38.15,20.7
  other v5: 55,18
  other v6: 55,18 52.3,19.1 32.55,20.7
N$BTN: BTN.3 BTN.4 R85.1 R86.2 | length 23.8
  Top Layer w0.076: BTN.3@19.3,11.25 v3(19.3,11.825) ; v3(19.3,12.65) BTN.4@19.3,14.575 ; BTN.4@19.325,15.175 21.925,15.175 22,15.25 22,15.9 v3(22.275,16.175)
  L3-SIG w0.076: v3(19.3,11.825) v3(19.3,12.65) ; v3(22.275,16.175) 22.325,16.225 22.7,16.225 23.325,16.85 v2(23.725,16.85) ; v2(27,18.6) 30.3,20.1 v2(32.5,21.3)
  L4-SIG w0.076: v2(23.725,16.85) 25.4,17 v2(27,18.6)
  Bottom Layer w0.076: v2(32.5,21.3) R86.2@33.2,21.45 34.1,21.45 35.3,20.25 R85.1@36.9,20.25
  other v4: 19.3,11.825 19.3,12.65 22.275,16.175
  other v5: 32.5,21.3
  other v6: 32.5,21.3
N$LD0B: LD0.1 R80.2 | length 14.3
  Top Layer w0.076: LD0.1@23.075,9.775 v3(23.2,9.825) ; v3(29,11.85) 29,15.3 v3(29.3,15.6)
  L3-SIG w0.076: v3(23.2,9.825) 23.675,10.075 23.9,10.3 25.4,10.3 27.1,10.575 27.225,10.7 27.55,10.7 27.6,10.75 27.65,10.75 28.75,11.85 v3(29,11.85)
  Bottom Layer w0.076: v3(29.3,15.6) 29.575,15.875 29.575,18.35 30.2,18.975 R80.2@30.2,19.05
  other v2: 29.3,15.6
  other v4: 23.2,9.825 29,11.85 29.3,15.6
  other v5: 29.3,15.6
  other v6: 29.3,15.6
N$LD0G: LD0.5 R82.2 | length 30.5
  Top Layer w0.076: v2(20.475,9.25) 20.6,9.125 20.6,8.975 20.95,8.625 20.95,8.575 21.1,8.425 21.1,7.9 21.55,7.45 v3(21.55,6.825) ; LD0.5@23.075,8.05 23.1,8.025 23.375,8.025 23.6,7.8 23.825,7.8 24,7.625 24,7.075 v1(24.025,7.05) ; v1(24.425,12.575) v1(24.425,15.7) ; v3(29.425,18.175) 29.575,16.8 29.575,16.5 29.475,16.4 v3(29.475,16.25)
  L3-SIG w0.076: v3(29.475,16.25) 29.625,16.125 29.75,16.1 29.775,16.075 30.825,16.075 v4(30.85,16.1)
  L4-SIG w0.076: v2(20.475,9.25) v5(22.95,11.175) ; v3(21.55,6.825) 21.7,6.825 21.8,6.725 21.825,6.725 21.85,6.7 22.05,6.7 22.2,6.55 22.225,6.55 22.25,6.525 22.55,6.525 22.575,6.5 22.925,6.5 22.95,6.525 22.975,6.525 23,6.55 23.025,6.55 23.65,6.7 23.675,6.725 23.7,6.725 v1(24.025,7.05) ; v1(24.425,15.7) 25.45,15.525 26.9,16.975 26.925,16.975 26.95,17 28.25,17 v3(29.425,18.175) ; v5(31.8,16.25) 32,16.45 32,16.7 v5(34.1,18.8)
  Bottom Layer w0.076: v5(22.95,11.175) v1(24.425,12.575) ; v4(30.85,16.1) 31,16.25 v5(31.8,16.25) ; v5(34.1,18.8) 34.35,19.05 R82.2@34.8,19.05
  other v2: 21.55,6.825 30.85,16.1 29.425,18.175
  other v3: 20.475,9.25
  other v4: 21.55,6.825 20.475,9.25 29.475,16.25 29.425,18.175
  other v5: 30.85,16.1
  other v6: 22.95,11.175 30.85,16.1 31.8,16.25 34.1,18.8
N$LD0R: LD0.3 R81.2 | length 16.4
  Top Layer w0.076: LD0.3@23.225,9.1 v2(24.05,10) ; v3(30.1,14.3) v3(30.1,15.3)
  L4-SIG w0.076: v2(24.05,10) 24.875,10.825 25,11.45 25.025,11.5 v5(25.9,12.4) ; v5(29.2,13.4) v3(30.1,14.3) ; v3(30.1,15.3) 28.9,16.5 28.9,16.8 v5(31.8,18.9)
  Bottom Layer w0.076: v5(25.9,12.4) 28.9,13.1 v5(29.2,13.4) ; v5(31.8,18.9) R81.2@32.5,19.05
  other v2: 30.1,14.3 30.1,15.3
  other v3: 24.05,10
  other v4: 24.05,10 30.1,14.3 30.1,15.3
  other v6: 25.9,12.4 29.2,13.4 31.8,18.9
N$LD1A: LD1.A R83.2 | length 21.9
  Top Layer w0.076: LD1.A@21.75,10.625 v3(21.95,10.575) ; v3(27.9,13.5) 27.9,11.7 v3(28,11.6) ; v3(29.3,13.5) v3(30.7,14.2) ; v3(31.6,14.2) 32,14.9 v3(33.3,16.1)
  L3-SIG w0.076: v3(21.95,10.575) v2(25.125,10.6) ; v2(27.7,12.1) v3(28,11.6) ; v3(27.9,13.5) v3(29.3,13.5) ; v3(30.7,14.2) v3(31.6,14.2)
  L4-SIG w0.076: v2(25.125,10.6) 25.375,11 25.425,11.225 25.425,11.25 25.475,11.3 25.5,11.35 25.5,11.375 25.55,11.425 25.55,11.45 25.6,11.5 25.6,11.525 26.075,12 26.3,12 26.35,11.975 26.525,11.8 v5(26.7,11.8) 27.2,11.3 27.6,11.3 27.8,11.5 v2(27.7,12.1) ; v3(33.3,16.1) 33.7,16.8 v5(35.3,18.4)
  Bottom Layer w0.076: v5(35.3,18.4) 36.45,18.4 R83.2@37.1,19.05
  other v2: 33.3,16.1
  other v4: 21.95,10.575 28,11.6 27.9,13.5 29.3,13.5 30.7,14.2 31.6,14.2 33.3,16.1
  other v6: 35.3,18.4
N$LD2A: LD2.A R84.2 | length 16.2
  Top Layer w0.076: LD2.A@21.75,12.925 v1(22.2,12.95) ; v3(29.4,14.45) 29.8,14.85 29.8,17.65 v3(30.4,18.25)
  L3-SIG w0.076: v3(30.4,18.25) 31.9,19.75 32.15,19.75 32.2,19.8 v2(32.6,19.8)
  L4-SIG w0.076: v5(28.8,13.45) 29.4,14.05 v3(29.4,14.45)
  Bottom Layer w0.076: v1(22.2,12.95) v5(28.8,13.45) ; v2(32.6,19.8) 33.05,20.25 R84.2@33.2,20.25
  other v2: 29.4,14.45
  other v4: 29.4,14.45 30.4,18.25
  other v5: 32.6,19.8
  other v6: 28.8,13.45 32.6,19.8
NetL1_1: L1.1 U5.5 | length 2
  Bottom Layer w0.8: U5.5@7.358,16.752 L1.1@7.583,18.754
NetL2_1: L2.1 U6.5 | length 2
  Bottom Layer w0.8: L2.1@1.452,10.485 U6.5@3.454,10.26
NetL3_1: L3.1 U7.5 | length 2
  Bottom Layer w0.8: U7.5@13.85,12.34 L3.1@15.851,12.115
NetLD3_A: LD3.A R107.1 | length 25.4
  Top Layer w0.076: 11.235,14.065 15.3,14.065 ; 15.3,15.8 LD3.A@21.05,15.8
  Top Layer w0.1: 8.6,4.15 11.235,4.15 11.235,14.065 ; 15.3,14.065 15.3,15.8
  Top Layer w0.15: v1(8.3,4.4) 8.6,4.15
  Bottom Layer w0.2: R107.1@7.85,5.15 v1(8.3,4.4)
NetLD3_K: LD3.K U8.7 | length 34.1
  Top Layer w0.076: v3(23.925,15.175) 24.375,17.4 24.375,19.4
  Top Layer w0.1: 9.6,6.6 9.9,7 9.9,8.1 10.575,8.1 10.575,19.4 24.375,19.4
  Top Layer w0.15: v1(9.1,6.1) 9.6,6.6
  L3-SIG w0.076: v3(23.275,15.475) v3(23.925,15.175)
  Bottom Layer w0.1: v1(9.1,6.1) U8.7@10.1,6.15
  other v4: 23.925,15.175 23.275,15.475
NetLD4_A: LD4.A R108.1 | length 26
  Top Layer w0.076: 11.7,16.7 16.45,16.7 16.475,16.725 16.5,16.725 16.525,16.75 16.575,16.75 16.6,16.775 16.65,16.775 16.9,17.025 17.35,17.025 17.375,17.05 17.5,17.05 17.525,17.075 17.55,17.075 17.575,17.1 17.625,17.1 17.65,17.125 17.7,17.15 17.75,17.15 17.775,17.175 17.8,17.175 17.875,17.25 LD4.A@21.05,17.25
  Top Layer w0.1: 7.6,5.6 11.015,5.6 11.015,14.3 11.7,14.5 11.7,16.7
  Top Layer w0.15: v1(7.2,5.8) 7.6,5.6
  Bottom Layer w0.2: R108.1@6.5,5.15 6.8,5.5 v1(7.2,5.8)
NetLD4_K: LD4.K U8.9 | length 25.6
  Top Layer w0.076: LD4.K@22.65,17.725 22.65,19.1
  Top Layer w0.1: v1(10.25,7.35) 10.795,7.7 10.795,14.9 11.42,15.15 11.42,19.1 22.65,19.1
  Bottom Layer w0.1: v1(10.25,7.35) U8.9@10.75,7.3
NetR102_2: R102.2 U8.16 | length 1.3
  Bottom Layer w0.1: U8.16@12.9,5.15 13.35,4.9 R102.2@13.851,4.349
NetR103_2: R103.2 U8.12 | length 3
  Bottom Layer w0.1: U8.12@12.25,7.3 12.25,7.75 12.55,8.05 12.55,9.75 R103.2@12.8,10.1
NetR104_2: R104.2 U8.14 | length 2.5
  Bottom Layer w0.1: U8.14@12.9,6.15 13.3,6.22 14.6,6.22 R104.2@15.153,6.752
NetR105_2: R105.2 U8.15 | length 1
  Bottom Layer w0.15: U8.15@12.9,5.65 R105.2@13.851,5.55
NetR106_2: R106.2 U8.1 | length 1.4
  Bottom Layer w0.15: U8.1@12.25,4.5 R106.2@12.702,3.147
NODE_P0: R10.1 R11.2 R12.2 | length 14
  L3-SIG w0.076: v2(41,3.5) 44.6,3.8 45.7,3.8 46.7,3.6 46.9,3.4 46.9,3.1 46.7,2.9 46,2.9 45.7,2.6 v1(45.7,1.6)
  L4-SIG w0.076: v5(45.3,1.85) 46.3,1.85 v5(46.7,2.25)
  Bottom Layer w0.076: R12.2@40.75,3.95 v2(41,3.5) ; v5(45.3,1.85) 45.3,2.2 R10.1@44.75,2.75 v1(45.7,1.6) ; R11.2@46.55,2.75 46.7,2.6 v5(46.7,2.25)
  other v5: 41,3.5
  other v6: 45.3,1.85 46.7,2.25 41,3.5
NODE_P1: R14.1 R15.2 R16.2 | length 7.9
  L3-SIG w0.076: v1(43.4,1.89) 43.6,2.6 v1(44.69,3.45) 44.69,2.95 45.59,2.95 v1(45.59,3.45)
  Bottom Layer w0.076: R14.1@42.55,3.95 42.55,3.65 43.13,3.65 43.13,2.05 v1(43.4,1.89) ; R15.2@44.35,3.95 v1(44.69,3.45) ; R16.2@45.55,3.95 v1(45.59,3.45)
PMOD-1: J1.1 R26.2 | length 2
  Bottom Layer w0.076: R26.2@63.45,5.65 64.15,6.35 J1.1@65.13,6.35
PMOD-2: J1.2 R27.2 | length 5.8
  Top Layer w0.076: v3(60.4,8.5) J1.2@65.13,8.89
  Bottom Layer w0.076: R27.2@59.35,8.49 v3(60.4,8.5)
  other v2: 60.4,8.5
  other v4: 60.4,8.5
  other v5: 60.4,8.5
  other v6: 60.4,8.5
PMOD-3: J1.3 R28.2 | length 4.9
  Bottom Layer w0.076: R28.2@61.4,8.49 64.34,11.43 J1.3@65.13,11.43
PMOD-4: J1.4 R29.2 | length 6.2
  Top Layer w0.076: v1(63.5,9.9) 63.5,12.34 J1.4@65.13,13.97
  Bottom Layer w0.076: R29.2@63.45,8.49 v1(63.5,9.9)
PMOD-7: J1.7 R30.1 | length 11.6
  Top Layer w0.076: v1(58.3,10.5) 61.7,9.1 v3(62,9)
  L3-SIG w0.076: v3(62,9) 63.5,7.5 66.1,7.5 J1.7@67.67,6.35
  Bottom Layer w0.076: v1(58.3,10.5) R30.1@58.75,11.33
  other v4: 62,9
PMOD-8: J1.8 R31.1 | length 7.6
  L3-SIG w0.076: v1(62.3,11) 65.2,10 66.56,10 J1.8@67.67,8.89
  Bottom Layer w0.076: R31.1@60.8,11.33 61.13,11 v1(62.3,11)
PMOD-9: J1.9 R32.1 | length 5.7
  Bottom Layer w0.076: R32.1@62.85,11.33 64.02,12.5 66.2,12.5 J1.9@67.67,11.43
PMOD-10: J1.10 R33.1 | length 9.8
  Top Layer w0.076: v3(59.6,14.6) 63.6,14.6 64.1,15.1 66.54,15.1 J1.10@67.67,13.97
  Bottom Layer w0.076: R33.1@58.75,14.17 59.18,14.6 v3(59.6,14.6)
  other v2: 59.6,14.6
  other v4: 59.6,14.6
  other v5: 59.6,14.6
  other v6: 59.6,14.6
PROG#: R4.1 R99.1 U2.21 | length 48.8
  Top Layer w0.076: v3(28.15,10.6) 28.15,9.95 28.825,9.275 29.45,9.275 29.65,9.075 U2.21@29.725,7.9 ; v3(31.65,10.6) 31.75,10.5 32.5,10.5 v3(32.95,10.95) ; v3(53.2,18.4) 53.6,18.8 54.9,18.8 v3(56.25,18.75) ; v3(59.5,15.8) R4.1@60.15,15.378 60.725,15.875 61.1,16.25 v1(61.1,18.7)
  L3-SIG w0.076: v3(28.15,10.6) v3(31.65,10.6) ; v1(40.45,14.6) 40.45,15.65 41.05,16.25 v2(41.25,17.55) ; v3(56.25,18.75) 57.05,18.75 58.9,16.9 59.45,16.9 59.65,16.7 59.65,15.95 v3(59.5,15.8)
  L4-SIG w0.076: v2(41.25,17.55) 43.15,17.5 43.45,17.8 v5(43.95,17.8) ; v5(48.75,17.45) v5(49.4,17.45) ; v5(51,17) 52.4,17 53.2,17.8 v3(53.2,18.4)
  Bottom Layer w0.076: v3(32.95,10.95) 34.3,12.3 38.9,12.3 39.8,13.2 39.8,13.95 v1(40.45,14.6) ; v5(43.95,17.8) 44.15,17.55 v5(48.75,17.45) ; v5(49.4,17.45) 50.55,17.45 v5(51,17) ; R99.1@60.8,19.85 v1(61.1,18.7)
  other v2: 32.95,10.95 53.2,18.4
  other v4: 28.15,10.6 31.65,10.6 32.95,10.95 59.5,15.8 53.2,18.4 56.25,18.75
  other v5: 32.95,10.95
  other v6: 32.95,10.95 51,17 48.75,17.45 49.4,17.45 43.95,17.8
PUDC_B: R23.2 U1.E18 | length 15
  Top Layer w0.076: U1.E18@50.4,14.4 50.65,14.65 51.112,14.65 51.163,14.6 v3(51.25,14.6)
  L3-SIG w0.076: v2(54.1,10.2) v2(54.1,11.15) ; v2(54.45,6.45) v2(54.45,9.15)
  L4-SIG w0.076: v3(51.25,14.6) 51.45,14.8 52.1,14.8 52.2,14.7 53.7,14.7 53.75,14.65 53.8,14.65 53.9,14.55 53.9,14.5 53.95,14.45 53.95,13.8 54.1,13.65 v2(54.1,11.15) ; v2(54.45,6.45) 55.2,5.7 v5(55.2,5.25)
  Bottom Layer w0.076: v2(54.1,10.2) 54.45,9.85 v2(54.45,9.15) ; v5(55.2,5.25) 55.35,5.1 R23.2@55.35,3.95
  other v2: 51.25,14.6
  other v4: 51.25,14.6
  other v5: 54.45,9.15 54.1,10.2
  other v6: 55.2,5.25 54.45,9.15 54.1,10.2
RAS#: U1.V3 U3.18 | length 21
  Top Layer w0.076: v1(39.15,4.4) 42.325,6.225 42.65,6.55 42.65,7.187 42.65,7.65 U1.V3@42.9,7.9
  L3-SIG w0.125: v1(25.55,6.975) 25.55,6.75 26.95,5.35 38.6,4.75 v1(39.15,4.4)
  Bottom Layer w0.125: U3.18@25.15,6.17 v1(25.55,6.975)